# Altium PCB FMU3_REV_E.PcbDoc (part 4 of 4)
Units mm, origin at the board's own origin, x right, y up, seen from the top; angles counter-clockwise.
Board outline 34.01 x 34.03 mm, 8 copper layers (Top, GND_top, HorizontalTop, Verticall_top, Horizontal_bot, VerticalBot, GND_BOT, Bottom), stack 1.63 mm thick; 171 components, 250 nets, 878 pads, 427 vias.
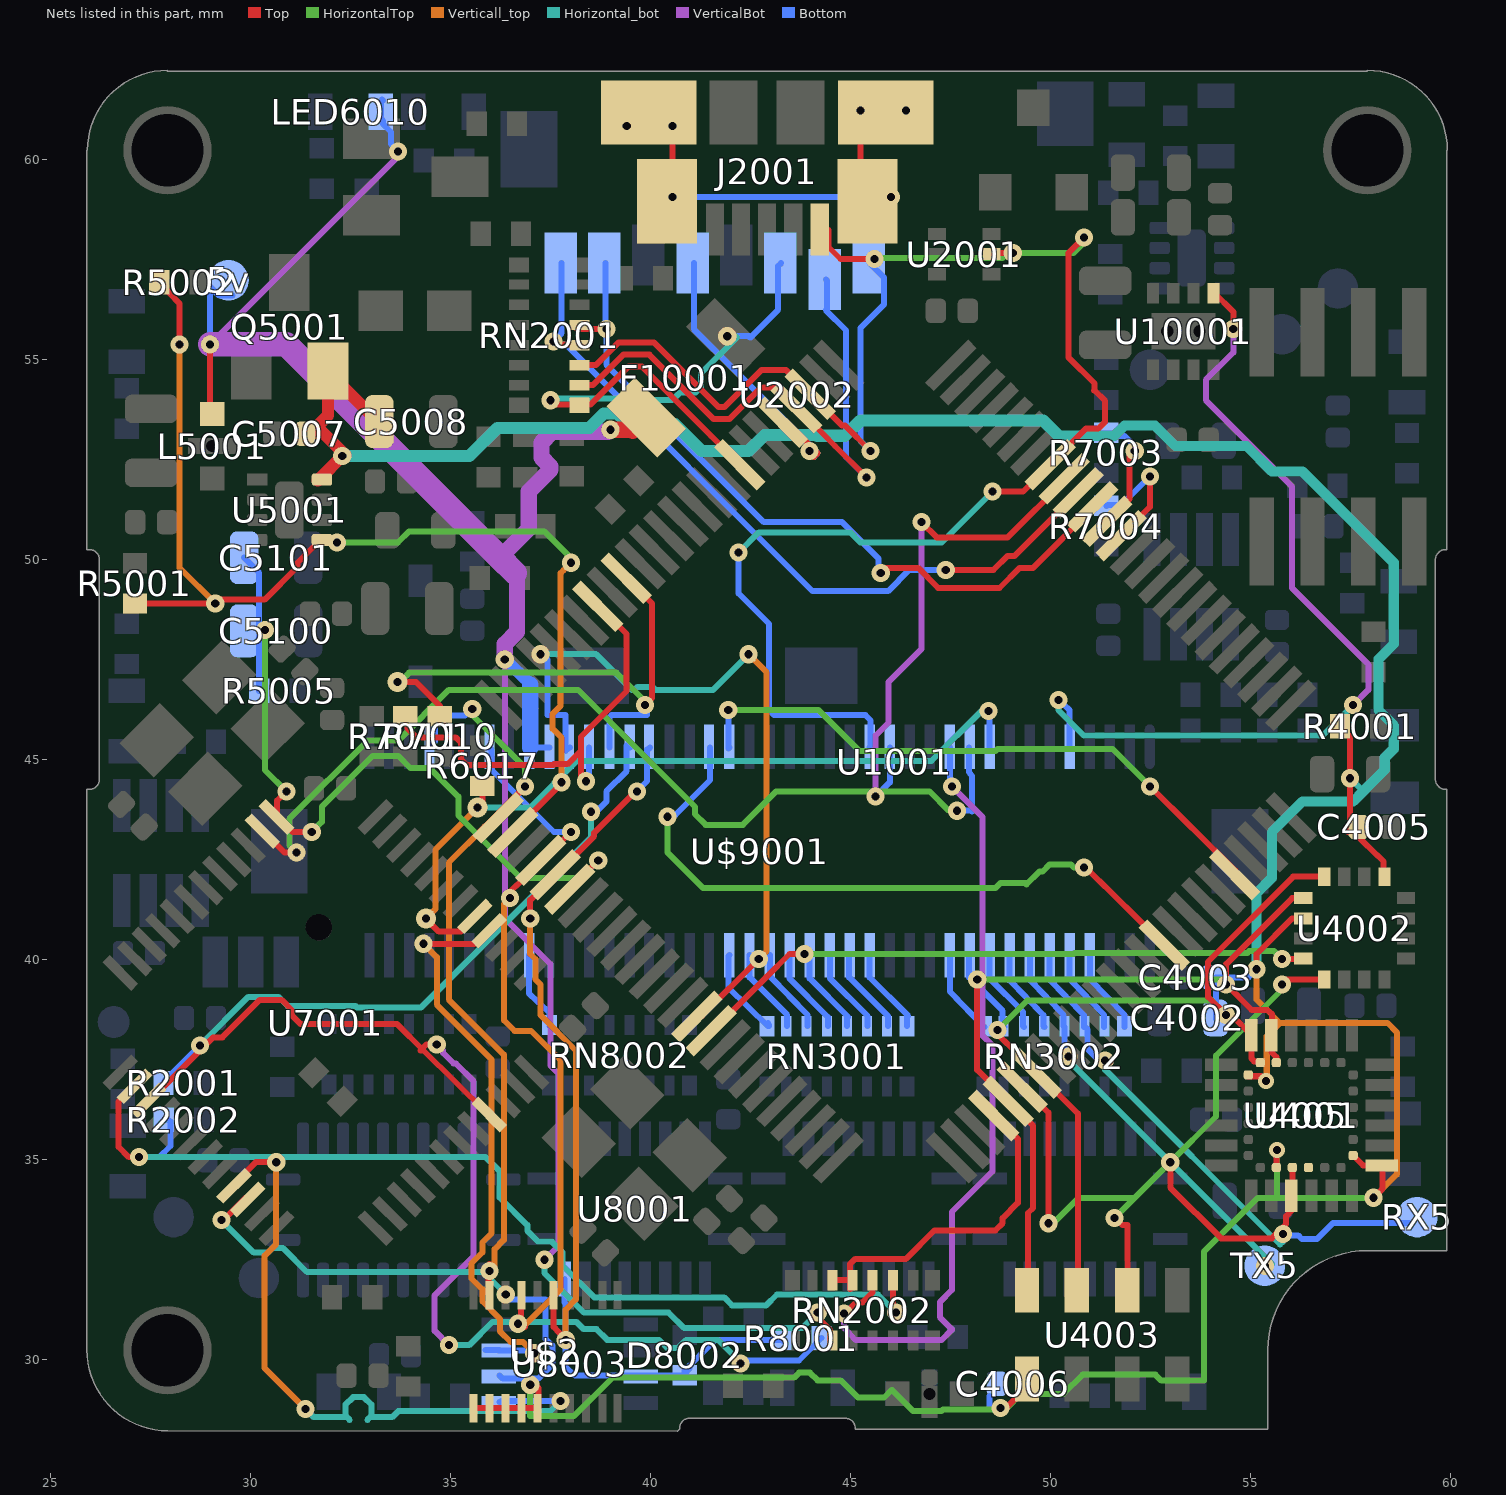
[diagram p10: the nets of this part, all layers, seen from the top]

## Via types
v1: diameter 0.453/0.453/0.453/0.453/0.453/0.453/0.453/0.453 (per signal layer), hole 0.203, Top to Bottom, tented both sides, 178 vias
v2: diameter 0.453/0.453/0.453/0.453 (per signal layer), hole 0.203, Top to Verticall_top, tented both sides, 117 vias
v3: diameter 0.453/0.453/0.453/0.453 (per signal layer), hole 0.203, Horizontal_bot to Bottom, tented both sides, 94 vias
v4: diameter 0.4, hole 0.2, Horizontal_bot to Bottom, tented both sides, 8 vias
v5: diameter 0.4, hole 0.2, Top to Verticall_top, tented both sides, 7 vias
v6: diameter 0.45, hole 0.2, Horizontal_bot to Bottom, tented bottom, 4 vias
v7: diameter 0.5, hole 0.2, Top to Verticall_top, tented both sides, 4 vias
v8: diameter 0.4, hole 0.2, Top to Bottom, tented bottom, 2 vias
v9: diameter 0.453/0.453/0.453/0.453/0.453/0.453/0.453/0.453 (per signal layer), hole 0.203, Top to Bottom, tented top, 2 vias
v10: diameter 0.5, hole 0.2, Horizontal_bot to Bottom, tented both sides, 2 vias
v11: diameter 0.453/0.453/0.453/0.453 (per signal layer), hole 0.203, Horizontal_bot to Bottom, tented bottom, 1 vias
v12: diameter 0.45, hole 0.2, Top to Verticall_top, tented top, 1 vias
v13: diameter 0/0/0/0/0/0 (per signal layer), hole 0.66, HorizontalTop to Bottom, tented bottom, 1 vias
v14: diameter 0.5, hole 0.2, Top to Bottom, tented both sides, 1 vias
v15: diameter 0.4, hole 0.2, Top to Bottom, tented both sides, 1 vias
v16: diameter 0.453/0.453/0.453/0.453/0.453/0.453/0.453/0.453 (per signal layer), hole 0.203, Top to Bottom, tented bottom, 1 vias
v17: diameter 0.453/0.453/0.453/0.453 (per signal layer), hole 0.203, Top to Verticall_top, tented top, 1 vias
v18: diameter 0.5, hole 0.2, HorizontalTop to Bottom, tented both sides, 1 vias
v19: diameter 0.4, hole 0.2, Top to Verticall_top, tented top, 1 vias

## Nets (pads, with @x,y where several pads share a name; then routed paths per layer and width w, separated by ;. In a path a pad name is that pad's centre, name@x,y a point inside that pad or via, vN(x,y) a via of type N, cw(c..) or ccw(c..) an arc to the next point about the centre after c; other vN are vias at no path point) (continued)
PRESSURE_SENS_IN: RN2002.12 U$9001.21 | length 20.2
  Top w0.15: v1(44.831,31.14) 45.136,31.42 45.288,31.42 45.542,31.674 RN2002.12@45.542,31.979
  VerticalBot w0.15: v1(44.831,31.14) 44.831,30.785 45.11,30.48 47.269,30.48 47.523,30.734 47.523,30.754 47.223,31.054 47.223,31.43 47.523,31.73 47.523,33.68 48.539,34.696 48.539,35.865 48.539,37.846 48.285,38.1 48.285,43.561 v3(47.523,44.323)
  Bottom w0.15: U$9001.21@47.473,45.288 47.473,44.399 v3(47.523,44.323)
PROT_SPARE_1: RN3002.16 U$9001.8 | length 2.2
  Bottom w0.15: U$9001.8@50.978,40.107 50.978,39.497 51.841,38.608 51.841,38.329 RN3002.16@51.841,38.303
PROT_SPARE_2: RN3002.15 U$9001.10 | length 2.2
  Bottom w0.15: U$9001.10@50.47,40.107 50.47,39.497 51.333,38.608 51.333,38.329 RN3002.15@51.333,38.303
REGOUT: U405.10
RSSI_IN: R8001.P$1 U7001.15 U7001.33 | length 30.3
  Top w0.15: U7001.15@27.457,36.449 29.058,38.049 29.286,38.049 30.22,38.983 30.769,38.983 31.033,38.719 31.033,38.588 31.242,38.379 33.655,38.379 34.315,37.719 ; v1(34.646,37.871) 34.392,37.871 34.239,37.719 34.315,37.719 ; U7001.33@35.966,36.144 35.916,36.144 34.315,37.719
  Horizontal_bot w0.15: v3(34.95,30.353) 35.458,30.353 36.039,30.934 38.137,30.934 38.319,30.751 38.639,30.751 38.905,30.485 40.199,30.485 40.403,30.28 40.674,30.28 40.878,30.485 41.677,30.485 42.266,29.896 v3(42.24,29.896)
  VerticalBot w0.15: v1(34.646,37.871) 34.804,37.713 34.804,37.659 35.068,37.394 35.123,37.394 35.57,36.947 35.57,32.572 34.593,31.596 34.593,30.71 v3(34.95,30.353)
  Bottom w0.15: v3(42.24,29.896) 42.314,29.97 43.703,29.97 R8001.P$1@44.264,30.531
S.BUS_OUT: RN8002.9 U$9001.64 | length 2
  Bottom w0.15: U$9001.64@36.957,40.107 36.957,40.081 36.957,39.141 37.465,38.659 RN8002.9@37.465,38.329
S\B\U\S\_\O\U\T\P\U\T\_\E\N\: U7001.40 U8003.7 | length 15.1
  Top w0.15: v2(34.315,40.386) 35.585,40.386 U7001.40@35.966,40.742
  Verticall_top w0.15: v2(34.315,40.386) 34.648,40.053 34.648,38.864 36.02,37.491 36.02,33.15 35.791,32.921 35.791,32.672 35.514,32.395 35.514,32.02 35.779,31.754 35.791,31.754 35.791,31.443 36.225,31.009 36.225,30.699 36.49,30.434 36.8,30.434 v1(37.084,30.15)
  Bottom w0.15: U8003.7@35.865,30.226 U8003.7@36.22,30.226 ; U8003.7@36.195,30.221 37.013,30.221 v1(37.084,30.15)
SAFETY: R6017.P$1 U7001.41 U$9001.17 | length 20.1
  Top w0.15: v7(34.374,41.013) 34.699,40.688 35.253,40.688 35.598,41.033 U7001.41@35.598,41.073 ; v14(35.662,43.79) 35.789,43.917 R6017.P$1@35.789,44.331
  Verticall_top w0.15: v7(34.374,41.013) 34.62,41.258 34.62,42.748 v14(35.662,43.79)
  Horizontal_bot w0.15: v14(35.662,43.79) 36.982,43.79 38.151,44.958 47.015,44.958 48.26,46.203 v3(48.438,46.203)
  Bottom w0.15: v3(48.438,46.203) 48.463,46.177 U$9001.17@48.463,45.288
SBUS_INPUT: U7001.22 U8003.6 | length 13.4
  Top w0.15: v1(29.261,33.477) 29.235,33.477 29.235,33.401 29.87,34.036 U7001.22@29.947,34.036
  Horizontal_bot w0.15: v1(29.261,33.477) 30.074,32.664 30.419,32.664 30.534,32.779 30.804,32.779 31.401,32.182 35.814,32.182 36.303,31.692 v3(36.373,31.623) v3@36.22,31.623
  Bottom w0.15: U8003.6@36.22,29.591 36.297,29.515 37.186,29.515 37.537,29.866 37.537,30.337 37.363,30.511 37.363,31.496 36.5,31.496 v3(36.373,31.623)
SBUS_OUTPUT: U7001.21 U8003.5 | length 17.2
  Top w0.15: U7001.21@29.591,34.366 29.591,34.392 30.124,34.925 v2(30.632,34.925)
  Verticall_top w0.15: v2(30.632,34.925) 30.632,32.878 30.342,32.587 30.342,29.78 v1(31.369,28.753)
  Horizontal_bot w0.15: v1(31.369,28.753) 31.57,28.552 32.403,28.552 ; 32.469,28.486 32.363,28.592 32.363,28.863 32.555,29.054 32.825,29.054 33.016,28.863 33.016,28.592 32.911,28.486 ; 32.976,28.552 33.53,28.552 33.68,28.702 37.49,28.702 v3(37.744,28.956)
  Bottom w0.15: U8003.5@36.22,28.931 36.246,28.931 36.271,28.956 v3(37.744,28.956)
SBUS_UNPROTECTED: D8002.C R8001.P$2 U8001.9 U8003.3 | length 8.4
  Bottom w0.15: U8001.9@37.846,32.004 37.846,31.42 37.871,31.369 37.871,29.794 38.1,29.591 40.767,29.591 D8002.C@40.843,29.642 ; D8002.C@40.843,29.616 D8002.C@40.843,29.642 ; D8002.C@40.97,29.845 40.97,29.769 D8002.C@40.843,29.642 ; R8001.P$2@43.307,30.455 43.286,30.476 41.601,30.476 40.843,29.718 D8002.C@40.843,29.642
SDIO_CK: U1001.80 U2002.5 | length 7.9
  Top w0.15: U1001.80@43.282,53.442 43.383,53.442 44.171,52.654 44.075,52.559 43.967,52.666 v1(43.967,52.705)
  Bottom w0.15: U2002.5@41.072,57.404 41.072,55.753 44.171,52.654 44.075,52.559 43.967,52.666 v1(43.967,52.705)
SDIO_CMD: RN2001.1 U1001.83 U2002.3 | length 14.7
  Top w0.15: v1(37.49,53.975) 37.617,53.873 38.379,53.873 38.495,53.873 39.435,54.813 39.776,54.813 41.504,53.086 U1001.83@42.215,52.375
  Horizontal_bot w0.15: v1(37.49,53.975) 37.536,54.021 39.313,54.021 39.359,53.975 40.533,53.975 40.732,54.174 41.118,54.174 41.254,54.31 41.254,54.645 42.148,55.54 42.113,55.575 v11(41.91,55.575)
  Bottom w0.15: v11(41.91,55.575) 42.448,55.575 42.484,55.54 43.182,56.238 43.182,57.33 U2002.3@43.256,57.404
SDIO_D0: RN2001.5 U1001.65 U2002.7 | length 19
  Top w0.15: RN2001.5@38.151,55.753 RN2001.5@38.278,55.753 ; RN2001.5@38.227,55.855 38.227,55.829 RN2001.5@38.278,55.753 ; v1(38.887,55.753) RN2001.5@38.278,55.753 ; v1(45.745,49.657) 45.872,49.784 46.68,49.784 47.183,49.28 48.715,49.28 49.219,49.784 49.555,49.784 51.054,51.283 U1001.65@51.054,51.308
  Bottom w0.15: U2002.7@38.862,57.404 38.862,55.804 v1(38.887,55.753) 38.887,54.864 42.824,50.927 44.78,50.927 45.695,50.013 45.695,49.708 v1(45.745,49.657)
SDIO_D1: RN2001.4 U1001.66 U2002.8 | length 19.6
  Top w0.15: v1(37.567,55.448) 37.49,55.372 RN2001.4@38.227,55.372 ; v1(47.371,49.733) 48.567,49.733 48.92,50.086 49.096,50.086 50.673,51.664 U1001.66@50.698,51.664
  Bottom w0.15: U2002.8@37.77,57.404 37.77,55.651 v1(37.567,55.448) 37.617,55.372 37.871,55.372 44.039,49.204 45.933,49.204 46.462,49.733 v1(47.371,49.733)
SDIO_D2: RN2001.3 U1001.78 U2002.1 | length 14.6
  Top w0.15: RN2001.3@38.215,54.851 38.624,54.851 39.186,55.413 40.083,55.413 41.686,53.811 41.844,53.811 42.77,54.737 43.373,54.737 U1001.78@43.982,54.128 ; U1001.78@43.987,54.133 44.78,53.34 44.856,53.34 v1(45.491,52.705)
  Bottom w0.15: U2002.1@45.466,57.404 45.822,57.048 45.822,56.363 45.237,55.778 45.237,52.959 v1(45.491,52.705)
SDIO_D3: RN2001.2 U1001.79 U2002.2 | length 14.8
  Top w0.15: RN2001.2@38.215,54.351 38.548,54.351 39.311,55.113 39.959,55.113 41.562,53.511 41.968,53.511 42.757,54.3 43.128,54.3 U1001.79@43.64,53.787 ; U1001.79@43.631,53.778 43.637,53.772 43.688,53.772 44.602,52.832 v1@45.364,52.07
  Bottom w0.15: U2002.2@44.374,56.998 44.397,56.975 44.397,56.252 44.374,56.229 44.879,55.724 44.879,52.556 45.364,52.07 v1@45.364,52.045
  other v1: 45.39,52.045
SERIAL1_CTS: RN3001.9 U$9001.44 | length 2.3
  Bottom w0.15: U$9001.44@41.961,40.107 41.935,40.081 41.935,39.294 42.926,38.329 42.951,38.329 42.951,38.354 RN3001.9@42.926,38.405
SERIAL1_RTS: RN3001.10 U$9001.42 | length 2.2
  Bottom w0.15: U$9001.42@42.469,40.107 42.469,39.548 43.409,38.608 RN3001.10@43.409,38.329
SERIAL1_RX: RN3001.12 U$9001.38 | length 2.2
  Bottom w0.15: U$9001.38@43.459,40.107 43.459,39.522 44.425,38.557 RN3001.12@44.425,38.329
SERIAL1_TX: RN3001.11 U$9001.40 | length 2.2
  Bottom w0.15: U$9001.40@42.977,40.107 42.977,39.573 43.917,38.608 RN3001.11@43.917,38.329
SERIAL2_CTS: RN3001.15 U$9001.32 | length 2.2
  Bottom w0.15: U$9001.32@44.958,40.107 44.958,39.548 45.923,38.583 RN3001.15@45.923,38.329
SERIAL2_RTS: RN3001.16 U$9001.30 | length 2.2
  Bottom w0.15: U$9001.30@45.466,40.107 45.466,39.548 46.431,38.583 46.406,38.583 RN3001.16@46.406,38.329
SERIAL2_RX: RN3001.14 U$9001.34 | length 2.2
  Bottom w0.15: U$9001.34@44.475,40.107 44.475,39.522 45.415,38.583 45.415,38.557 RN3001.14@45.415,38.329
SERIAL2_TX: RN3001.13 U$9001.36 | length 2.2
  Bottom w0.15: U$9001.36@43.967,40.107 43.967,39.522 44.933,38.557 44.907,38.557 RN3001.13@44.907,38.329
SERIAL3_RX: RN3002.10 U$9001.20 | length 2.2
  Bottom w0.15: U$9001.20@47.955,40.107 47.955,39.548 48.793,38.71 48.793,38.354 RN3002.10@48.844,38.303
SERIAL3_TX: RN3002.9 U$9001.22 | length 2.2
  Bottom w0.15: U$9001.22@47.473,40.107 47.473,39.192 RN3002.9@48.336,38.303
SERIAL4_RX: RN3002.12 U$9001.16 | length 2.2
  Bottom w0.15: U$9001.16@48.971,40.107 48.971,39.472 49.809,38.608 49.809,38.329 RN3002.12@49.835,38.303
SERIAL4_TX: RN3002.11 U$9001.18 | length 2.2
  Bottom w0.15: U$9001.18@48.463,40.107 48.463,39.525 49.301,38.687 49.301,38.329 RN3002.11@49.327,38.303
SERIAL5_RX: RN3002.14 RX5.P$1 U$9001.12 | length 13.4
  Horizontal_bot w0.15: v6(51.359,37.465) 51.359,37.236 55.728,32.868 55.802,32.942 v6(55.802,33.128)
  Bottom w0.15: U$9001.12@49.962,40.107 49.962,39.497 50.825,38.608 RN3002.14@50.825,38.303 ; RN3002.14@50.839,38.329 50.92,38.248 50.92,37.752 51.206,37.465 v6(51.359,37.465) ; v6(55.802,33.128) 55.833,33.096 56.181,33.096 56.277,33 56.651,33 57.048,33.397 57.048,33.401 RX5.P$1@58.953,33.401
SERIAL5_TX: RN3002.13 TX5.P$1 U$9001.14 | length 10.3
  Horizontal_bot w0.15: v6(50.444,37.567) 50.444,37.465 55.524,32.385 55.474,32.334 v6(55.347,32.334)
  Bottom w0.15: U$9001.14@49.479,40.107 49.479,39.472 50.317,38.608 50.317,38.329 50.343,38.303 v6@50.343,37.668
SERIAL_FMU_TO_IO: R7004.P$2 U1001.63 | length 3.2
  Top w0.15: U1001.63@51.765,50.597 52.476,51.308 v1(52.476,52.07)
  Bottom w0.15: R7004.P$2@51.384,51.333 51.435,51.359 51.765,51.359 v1(52.476,52.07)
SERIAL_IO_TO_FMU: R7003.P$2 U1001.64 | length 3
  Top w0.15: U1001.64@51.41,50.952 51.968,51.511 51.968,52.578 v1(52.095,52.705)
  Bottom w0.15: R7003.P$2@51.384,53.162 51.46,53.086 51.841,53.086 52.095,52.832 v1(52.095,52.705)
SPI_EXT_MISO: U1001.4 U$2.14 U$9001.67 | length 18.5
  Top w0.15: v2(36.474,41.529) 36.474,41.681 37.269,42.451 37.287,42.469 v1(37.998,43.18) ; U$2.14@36.779,31.598 36.754,31.572 36.754,30.963 v2(36.678,30.886) 36.779,30.886 v2@36.855,30.81
  Verticall_top w0.15: v2(36.474,41.529) 36.326,41.381 36.326,38.471 36.592,38.206 37.009,38.206 37.744,37.47 37.744,31.75 36.881,30.886 v2(36.678,30.886)
  Bottom w0.15: U$9001.67@35.966,45.288 36.015,45.24 36.015,44.742 37.577,43.18 v1(37.998,43.18)
SPI_EXT_MOSI: U1001.5 U$2.10 U$9001.51 | length 18.1
  Top w0.15: v2(36.982,41.021) 36.982,41.478 U1001.5@37.694,42.189 ; U$2.10@37.567,31.598 37.567,30.81 v2(37.871,30.48) v2@37.871,30.505 ; U1001.5@37.617,42.113 37.694,42.113 U1001.5@37.694,42.189 ; v1(39.649,44.196) 39.619,44.196 38.583,43.16 38.583,43.078 U1001.5@37.694,42.189
  Verticall_top w0.15: v2(36.982,41.021) 36.982,40.132 37.109,40.005 37.109,39.497 37.236,39.37 37.236,38.608 38.125,37.719 38.125,31.496 37.871,31.242 v2(37.871,30.48)
  Bottom w0.15: v1(39.649,44.196) 39.903,44.45 39.903,45.237 U$9001.51@39.98,45.288
SPI_EXT_SCK: U1001.1 U$2.18 U$9001.73 | length 19.6
  Top w0.15: U$2.18@35.966,31.598 35.966,31.623 35.941,31.623 35.941,32.029 35.966,32.029 v2@35.966,32.385 ; U1001.1@36.188,43.532 36.188,43.655 v2(36.855,44.323)
  HorizontalTop w0.15: v1(35.535,46.253) 35.535,46.105 36.855,44.784 v2(36.855,44.323)
  Verticall_top w0.15: v2(35.966,32.207) 36.093,32.334 36.093,32.754 36.324,32.985 36.324,37.615 34.95,38.989 34.95,42.418 35.846,43.313 35.859,43.313 36.855,44.31 v2(36.855,44.323)
  Bottom w0.15: U$9001.73@34.468,45.314 34.597,45.443 34.597,46.099 35.354,46.099
SPI_INT_MAG_!CS: U1001.16 U4002.4 | length 15.7
  Top w0.15: U1001.16@41.529,38.227 41.554,38.227 42.88,39.552 42.885,39.552 43.465,40.132 v2(43.84,40.132) ; v2(55.778,40.005) 56.286,40.005 56.286,40.03 U4002.4@56.312,40.03
  HorizontalTop w0.15: v2(43.84,40.132) 50.571,40.132 50.601,40.161 54.913,40.161 54.956,40.204 55.58,40.204 v2(55.778,40.005)
SPI_INT_MISO: U405.9 U1001.31 U4001.9 U4002.5 U4003.6 | length 22.5
  Top w0.15: U1001.31@49.301,36.805 49.936,36.17 v2(49.936,33.401) ; v2(51.587,33.528) 51.791,33.35 51.918,33.35 U4003.6@51.918,31.725 ; v2(52.984,34.925) 52.984,34.29 54.254,33.02 55.524,33.02 55.88,33.376 55.88,33.579 56.032,33.731 U4001.9@56.032,34.112 ; v2(55.778,39.37) 55.905,39.497 U4002.5@56.845,39.497 ; U4001.9@56.036,34.118 U405.9@56.036,34.793
  HorizontalTop w0.15: v2(49.936,33.401) 50.063,33.401 50.698,34.036 52.095,34.036 ; v2(51.587,33.528) 52.095,34.036 ; v2(55.778,39.37) 55.778,39.243 54.127,37.592 54.127,36.068 v2(52.984,34.925) 52.095,34.036
SPI_INT_MOSI: U405.24 U1001.32 U4001.24 U4002.16 U4003.7 | length 20.5
  Top w0.15: v2(48.666,38.227) 48.666,38.125 49.657,37.16 50.673,36.144 U4003.7@50.673,31.725 ; U4001.24@55.011,38.1 55.011,37.521 55.083,37.449 55.236,37.449 U405.24@55.236,37.415 ; U4001.24@55.016,38.1 54.508,38.608 v2(54.381,38.608) 53.929,39.061 53.929,39.933 56.058,42.062 U4002.16@56.845,42.062
  HorizontalTop w0.15: v2(48.666,38.227) 49.403,38.964 54.026,38.964 v2(54.381,38.608)
SPI_INT_SCK: U405.23 U1001.30 U4001.23 U4002.1 U4003.8 | length 20.5
  Top w0.15: v2(48.158,39.497) 48.158,37.236 49.555,35.839 49.555,33.782 49.428,33.655 U4003.8@49.428,31.725 ; U4001.23@55.511,38.1 55.511,37.682 55.636,37.557 U405.23@55.636,37.415 ; U4001.23@55.524,38.1 55.524,38.633 55.397,38.735 55.016,38.735 v2(54.381,39.37) 54.381,39.878 56.032,41.529 U4002.1@56.312,41.529
  HorizontalTop w0.15: v2(48.158,39.497) 54.254,39.497 v2(54.381,39.37)
USB_GND_SHIELD: J2001.GND1 J2001.GND2 J2001.GND3 J2001.GND4 | length 15.7
  Top w0.15: v1(39.395,60.833) J2001.GND4@39.395,60.96 ; J2001.GND4@39.954,61.265 40.107,61.265 v1(40.538,60.833) v1(40.538,59.055) 40.411,59.182 40.03,59.182 40.259,58.979 J2001.GND3@40.411,58.979 ; v1(45.237,61.214) 45.237,59.817 v1(45.999,59.055) 45.491,59.055 J2001.GND2@45.415,58.979
  Top w0.406: J2001.GND4@39.268,60.96 39.395,60.96 J2001.GND4@39.751,60.96 ; v1(45.237,61.214) v1(46.38,61.214) 46.38,61.265 J2001.GND1@45.872,61.265
  Bottom w0.15: v1@40.411,59.055 v1(40.538,59.055) v1(45.999,59.055)
  Bottom w0.406: v1(39.395,60.833) v1(40.538,60.833)
V\B\U\S\_\V\A\L\I\D\: U1001.15 U$9001.59 | length 19.1
  Top w0.15: U1001.15@41.173,38.583 41.275,38.583 v2(42.697,40.005)
  Verticall_top w0.15: v1(42.443,47.625) 42.896,47.172 42.896,40.204 v2(42.697,40.005)
  Horizontal_bot w0.15: v3(37.236,47.625) 38.633,47.625 39.522,46.736 39.593,46.736 39.665,46.808 40.04,46.808 40.112,46.736 41.554,46.736 v1(42.443,47.625)
  Bottom w0.15: v3(37.236,47.625) 37.363,47.498 37.414,47.498 37.414,46.101 37.871,46.101 37.871,45.212 U$9001.59@37.973,45.288
V\D\D\_\5\V\_\H\I\P\O\W\E\R\_\O\C\: U1001.41 U$9001.45 | length 17
  Top w0.15: v2(50.825,42.291) 50.876,42.291 U1001.41@52.832,40.361
  HorizontalTop w0.15: v1(40.411,43.561) 40.411,42.672 41.298,41.785 48.617,41.785 48.735,41.903 49.36,41.903 49.391,41.873 49.71,42.192 49.791,42.192 49.962,42.363 50.505,42.363 50.577,42.291 v2(50.825,42.291)
  Bottom w0.15: v1(40.411,43.561) 40.462,43.612 40.615,43.612 41.478,44.475 U$9001.45@41.478,45.288
V\D\D\_\5\V\_\P\E\R\I\P\H\_\E\N\: U1001.67 U$9001.27 | length 13.1
  Top w0.15: v1(46.761,50.927) 47.142,50.546 48.92,50.546 50.368,51.994 U1001.67@50.368,52.019
  VerticalBot w0.15: v3(45.618,44.069) 45.618,45.593 45.944,45.919 45.944,46.935 46.761,47.752 v1(46.761,50.927)
  Bottom w0.15: v3(45.618,44.069) 45.974,44.425 U$9001.27@45.974,45.288
V\D\D\_\5\V\_\P\E\R\I\P\H\_\O\C\: U1001.46 U$9001.43 | length 15.5
  Top w0.15: v2(52.476,44.323) 54.61,42.215 U1001.46@54.61,42.113
  HorizontalTop w0.15: v1(41.935,46.228) 44.196,46.228 45.212,45.212 48.618,45.212 48.661,45.256 51.544,45.256 v2(52.476,44.323)
  Bottom w0.15: U$9001.43@41.935,45.263 U$9001.43@41.935,45.288 ; v1(41.935,46.228) U$9001.43@41.935,45.288 ; U$9001.43@41.961,45.288 U$9001.43@41.935,45.288
V\D\D\_\B\A\C\K\U\P\_\V\A\L\I\D\: R7011.P$2 U1001.93 U$9001.57 | length 11.9
  Top w0.15: R7011.P$2@33.909,46.076 33.909,45.771 34.132,45.548 35.12,45.548 35.255,45.413 35.255,44.994 35.39,44.859 37.564,44.859 37.582,44.877 37.918,44.877 38.252,45.212 38.252,45.562 ; v1(38.379,44.45) 38.252,44.577 38.252,45.562 ; U1001.93@38.684,48.844 38.71,48.844 39.395,48.133 39.395,46.705 38.252,45.562
  Bottom w0.15: v1(38.379,44.45) 38.456,44.526 U$9001.57@38.456,45.288
V\D\D\_\B\R\I\C\K\_\V\A\L\I\D\: R7010.P$2 U1001.91 U$9001.55 | length 13.9
  Top w0.15: v7(33.663,46.935) 34.122,46.935 34.722,46.335 R7010.P$2@34.722,46.076 ; U1001.91@39.395,49.53 39.421,49.53 40.03,48.895 40.03,46.533 v1(39.853,46.355)
  HorizontalTop w0.15: v7(33.663,46.935) 33.727,46.935 33.955,47.163 39.137,47.163 39.853,46.448 v1(39.853,46.355)
  Bottom w0.15: U$9001.55@38.964,45.288 38.964,46.05 39.014,46.101 39.903,46.101 39.903,46.406 v1(39.853,46.355)
VBAT: C5100.2 C5101.2 R5005.P$1 U1001.6 U7001.1 | length 20.2
  Top w0.15: v1(30.886,44.196) 30.658,43.967 30.658,43.561 31.039,43.18 v2(31.521,43.18) ; U1001.6@37.973,41.758 v2@38.633,42.418
  HorizontalTop w0.15: v1(30.353,48.235) 30.353,44.729 v1(30.886,44.196) ; v2(31.521,43.18) 31.775,43.434 31.775,43.815 33.045,45.085 33.68,45.085 33.99,44.776 34.472,44.776 35.185,44.063 35.185,43.592 36.741,42.037 38.252,42.037 v2@38.633,42.418
  Bottom w0.15: C5101.2@29.832,50.038 30.209,49.662 R5005.P$1@30.209,46.711
  other v2: 38.684,42.469
VBUS: J2001.VBUS U1001.68 U2001.5 U$9001.29 | length 31.8
  Top w0.15: J2001.VBUS@44.221,58.445 44.44,58.227 44.44,57.806 44.74,57.506 v2(45.593,57.506) ; U2001.5@48.514,57.633 48.463,57.633 48.438,57.658 v2(49.047,57.658) ; v1(48.539,51.689) 49.301,51.689 49.987,52.375 50.013,52.375 50.013,52.4 50.876,53.264 51.181,53.264 51.354,53.437 51.354,53.959 51.089,54.225 ; v2(50.825,58.039) 50.673,57.887 50.444,57.658 50.444,55.042 51.089,54.397 51.089,54.225 ; 51.084,54.225 51.089,54.225
  HorizontalTop w0.15: v2(45.593,57.506) 45.568,57.531 48.793,57.531 48.92,57.658 v2(49.047,57.658) 50.571,57.658 50.825,57.912 v2(50.825,58.039)
  Horizontal_bot w0.15: v3(42.189,50.165) 42.697,50.673 44.983,50.673 45.237,50.419 47.269,50.419 v1(48.539,51.689)
  Bottom w0.15: v3(42.189,50.165) 42.189,49.149 42.951,48.387 42.951,46.228 43.078,46.101 45.364,46.101 45.491,45.974 45.491,45.339 U$9001.29@45.466,45.288
VDD_3V3_SENSORS: C4002.P$1 C4003.P$1 C4005.P$1 C4006.P$1 C5007.P$1 C5008.P$1 Q5001.E R4001.P$2 U405.1 U405.8 U405.13 U4001.13 U4002.2 U4002.13 U4003.1 U5001.8 U$2.11 U$2.13 U$2.15 U$2.17 U$2.19 | length 102.9
  Top w0.15: C5007.P$1@31.471,53.137 C5007.P$1@31.471,53.162 ; U5001.8@31.725,52.019 31.75,52.019 U5001.8@31.775,51.994 ; Q5001.E@31.928,54.712 31.928,54.737 Q5001.E@31.979,54.788 ; v1(32.283,52.578) 32.334,52.578 v1@32.36,52.603 ; C5008.P$1@33.071,53.442 C5008.P$1@33.071,53.543 ; U$2.19@35.585,28.778 37.186,28.778 37.186,29.286 37.109,29.362 v2(36.982,29.362) 37.008,29.362 v2@37.059,29.413 ; v1(48.743,28.778) 48.87,28.778 49.454,29.362 49.454,29.718 49.428,29.718 U4003.1@49.428,29.515 ; U4003.1@49.428,29.464 U4003.1@49.428,29.515 ; U4003.1@49.428,29.591 U4003.1@49.428,29.515 ; v1(55.143,39.751) 55.143,40.132 56.032,41.021 U4002.2@56.312,41.021 ; R4001.P$2@57.226,45.822 57.48,45.568 v1(57.48,44.526) C4005.P$1@57.48,43.256 ; 57.429,43.307 57.455,43.307 C4005.P$1@57.48,43.256 ; v1(58.064,34.036) 58.293,34.265 58.293,34.823 U4001.13@58.268,34.849 ; U4002.13@58.344,42.062 58.318,42.088 58.318,42.443 57.556,43.18 57.429,43.18 C4005.P$1@57.48,43.256
  Top w0.152: U405.1@54.936,37.109 54.936,37.075 55.254,37.075 v5(55.378,36.951) ; U405.8@55.636,34.793 55.636,35.214 v5(55.651,35.23) ; U405.13@57.558,35.093 57.808,34.843 U4001.13@58.268,34.843
  Top w0.305: C5007.P$1@31.369,53.162 31.471,53.162 31.801,53.162 v1@32.36,52.603 ; C5007.P$1@31.471,53.137 31.928,53.594 Q5001.E@31.928,54.712 ; U5001.8@31.674,51.968 31.725,52.019 v1(32.283,52.578) ; Q5001.E@31.979,54.788 31.979,54.635 C5008.P$1@33.071,53.543
  HorizontalTop w0.15: v2(36.982,29.362) 36.982,28.575 38.075,28.575 39.04,29.54 43.58,29.54 43.705,29.665 43.976,29.665 44.168,29.473 44.746,29.473 45.181,29.037 45.827,29.037 46.025,29.235 46.556,28.704 47.261,28.704 47.297,28.74 48.704,28.74 v1(48.743,28.778) 48.895,28.778 49.251,29.134 50.311,29.134 50.794,29.616 52.61,29.616 52.762,29.464 53.823,29.464 53.823,32.69 55.169,34.036 v1(58.064,34.036)
  HorizontalTop w0.152: 55.651,34.087 v5(55.651,35.23)
  Verticall_top w0.15: v1(55.143,39.751) 55.143,38.989 55.728,38.405 58.42,38.405 58.651,38.174 58.651,34.623 v1(58.064,34.036)
  Verticall_top w0.152: v5(55.378,36.951) 55.397,36.97 55.397,38.075 55.728,38.405
  Horizontal_bot w0.15: v1(57.48,44.526) 57.81,44.196
  Horizontal_bot w0.254: 50.19,53.086 51.587,53.086 51.841,53.34 52.603,53.34 53.111,52.832 54.889,52.832 55.524,52.197 56.286,52.197 58.572,49.911 58.572,47.879 58.191,47.498 58.191,46.228 58.572,45.847 58.572,45.264 58.348,45.04 58.348,44.734 57.81,44.196 57.556,43.942 56.286,43.942 55.524,43.18 55.524,42.037 55.143,41.656 v1(55.143,39.751)
  Horizontal_bot w0.305: v1(32.283,52.578) 35.458,52.578 36.163,53.282 38.462,53.282 38.822,53.642 39.156,53.642 39.424,53.375 40.603,53.375 41.273,52.705 42.443,52.705 42.847,53.109 44.135,53.109 44.158,53.086 44.856,53.086 45.237,53.467 49.809,53.467 50.19,53.086
  Bottom w0.15: 48.463,29.083 48.463,28.804 48.489,28.778 v1(48.743,28.778) ; C4002.P$1@54.178,38.532 54.127,38.506 54.127,39.548 54.94,39.548 v1(55.143,39.751)
VDD_3V3_SENSORS_EN: R5001.P$2 R5002.P$2 U1001.2 U5001.5 | length 28.6
  Top w0.15: R5001.P$2@27.102,48.92 27.127,48.895 v2(29.108,48.895) 29.203,48.99 30.346,48.99 31.166,49.809 31.166,49.911 31.674,50.419 v2(32.156,50.419) 31.826,50.419 U5001.5@31.775,50.495 ; R5002.P$2@27.737,56.921 27.737,56.896 28.219,56.388 v2(28.219,55.372) ; U1001.2@36.547,43.173 37.77,44.396 v2(37.77,44.425)
  HorizontalTop w0.15: v2(32.156,50.419) 33.675,50.419 33.954,50.698 37.338,50.698 37.998,50.038 v2(37.998,49.911)
  Verticall_top w0.15: v2(28.219,55.372) 28.219,49.781 28.222,49.781 v2(29.108,48.895) ; v2(37.77,44.425) 37.77,45.537 37.546,45.761 37.546,46.136 37.744,46.335 37.744,49.652 37.816,49.723 37.816,49.729 v2(37.998,49.911)
VDD_3V3_SPEKTRUM_EN: U7001.2 U$9001.19 | length 24.1
  Top w0.15: U7001.2@30.302,43.205 30.836,42.672 v2(31.14,42.672)
  HorizontalTop w0.15: v2(31.14,42.672) 30.963,42.85 30.963,43.51 32.918,45.466 33.68,45.466 34.95,46.736 38.177,46.736 41.102,43.812 41.102,43.627 41.367,43.362 42.297,43.362 43.13,44.196 46.965,44.196 47.447,43.713 v1(47.65,43.713)
  Bottom w0.15: v1(47.65,43.713) 48.006,43.713 48.031,43.688 48.031,44.577 47.955,44.679 U$9001.19@47.955,45.288
VDD_5V_IN: 5v.P$1 F10001.1 L5001.P$1 LED6010.A RN2002.3 U$9001.61 U$9001.63 | length 58.4
  Top w0.15: v1(28.981,55.372) 28.981,53.696 L5001.P$1@29.032,53.645 ; v1(44.171,31.166) 44.171,31.039 44.475,30.734 RN2002.3@44.475,30.378
  Top w0.406: v1(38.989,53.238) F10001.1@39.573,53.238 ; F10001.1@39.548,53.213 F10001.1@39.573,53.238 ; F10001.1@39.879,53.544 F10001.1@39.573,53.238
  Horizontal_bot w0.15: v3(37.338,32.487) 37.338,32.156 38.329,31.166 40.441,31.166 40.822,30.785 43.79,30.785 v1(44.171,31.166)
  VerticalBot w0.15: v1(28.981,55.372) 33.68,60.071 v3(33.68,60.198) ; v3(36.347,47.498) 36.347,41.021 37.49,39.878 37.49,37.338 37.691,37.137 37.691,32.84 v3(37.338,32.487)
  VerticalBot w0.406: 36.22,50.038 36.946,50.764 36.946,51.695 37.49,52.239 37.49,52.316 37.264,52.542 37.264,52.919 37.531,53.185 38.936,53.185 v1(38.989,53.238) ; v3(36.347,47.498) 36.347,47.879 36.652,48.184 36.652,49.606 36.601,49.657
  VerticalBot w0.61: v1(28.981,55.372) 30.886,55.372 36.22,50.038 36.601,49.657
  Bottom w0.15: v1(28.981,55.372) 28.981,56.82 29.21,56.591 5v.P$1@29.54,56.591 ; LED6010.A@33.274,61.493 33.299,61.468 33.249,61.417 LED6010.A@33.249,61.189 33.249,61.036 33.299,60.96 33.299,60.884 33.503,60.681 33.503,60.376 v3(33.68,60.198) ; U$9001.63@36.957,45.288 U$9001.61@37.465,45.288 ; 36.982,46.863 36.982,46.888
  Bottom w0.254: U$9001.63@36.957,45.288 U$9001.63@36.982,45.288
  Bottom w0.305: v3(36.347,47.498) 36.982,46.888
  Bottom w0.406: U$9001.63@36.982,45.288 36.982,46.863
VDD_5V_SENS: RN2002.13 RN2002.14 U1001.29 | length 8.8
  Top w0.15: RN2002.14@44.552,31.979 45.06,31.979 45.06,31.801 44.983,31.75 44.983,32.385 45.11,32.512 46.38,32.512 47.092,33.223 48.616,33.223 48.793,33.401 48.793,33.528 49.174,33.909 49.174,35.509 U1001.29@48.59,36.119
VDD_SERVO: R2001.P$2 U$9001.53 | length 16.3
  Horizontal_bot w0.15: v3(28.727,37.846) 28.727,37.851 29.937,39.061 30.691,39.061 30.92,38.832 32.611,38.832 32.652,38.79 34.249,38.79 38.506,43.048 v3(38.506,43.688)
  Bottom w0.15: R2001.P$2@27.838,36.906 27.838,36.957 v3(28.727,37.846) ; v3(38.506,43.688) 38.633,43.688 38.887,43.942 38.887,44.196 39.395,44.704 39.395,45.339 U$9001.53@39.472,45.288
VDD_SERVO_IN: U10001.1 U$9001.9 | length 22.2
  Top w0.15: U10001.1@54.077,56.667 54.559,56.185 v1(54.559,55.753)
  Horizontal_bot w0.15: v3(50.19,46.482) 50.19,46.228 50.825,45.593 56.794,45.593 v3(57.556,46.355)
  VerticalBot w0.15: v1(54.559,55.753) 54.559,55.169 53.873,54.483 53.873,53.975 56.032,51.816 56.032,49.276 57.937,47.371 57.937,46.736 v3(57.556,46.355)
  Bottom w0.15: v3(50.19,46.482) 50.47,46.228 U$9001.9@50.47,45.288
VDD_SERVO_SENS: R2002.P$1 RN2002.11 U7001.14 | length 26.3
  Top w0.15: U7001.14@27.127,36.855 26.695,36.449 26.695,35.306 26.949,35.052 v1(27.203,35.052) ; RN2002.11@46.05,31.979 46.05,31.293 46.101,31.217 46.126,31.191 v1(46.126,31.166)
  Horizontal_bot w0.15: v1(27.203,35.052) 35.865,35.052 36.22,34.696 36.22,34.043 36.912,33.352 36.912,33.214 37.186,32.939 37.526,32.939 37.791,32.674 37.791,32.344 38.588,31.547 41.829,31.547 42.029,31.347 42.883,31.347 43.154,31.617 45.675,31.617 v1(46.126,31.166)
  Bottom w0.15: v1(27.203,35.052) 27.711,35.052 27.991,35.331 27.991,35.941 27.915,35.992 R2002.P$1@27.838,35.992
pads on no net: J2001.GND5 J2001.GND6 J2001.ID M3_MOUNT1001.1 M3_MOUNT1003.1 M3_MOUNT1004.1 RN2001.6 RN2001.7 RN2001.8 RN2001.9 RN2001.10 RN2001.11 U405.2 U405.3 U405.4 U405.5 U405.6 U405.7 U405.14 U405.15 U405.16 U405.17 U405.19 U405.21 U3001.1 U3001.3 U4001.2 U4001.3 U4001.4 U4001.5 U4001.6 U4001.7 U4001.11 U4001.14 U4001.15 U4001.16 U4001.17 U4001.19 U4001.21 U4001.22 U4002.3 U4002.7 U4002.14 U4002.15 U4003.4 U10001.3 U10002.8 U$9001.hole-2
copper on no net:
  other v13: 53.723,40.797

## Polygon pours and split planes (outlines as drawn)
VDD_3V3_SENSORS on Horizontal_bot "Horizontal_bot-VDD_3V3_SENSORS" (solid, remove dead copper, pour order 22): 38.729,57.226 60.553,57.226 60.808,27.102 48.97,27.102 49.1,33.983 53.797,34.11 53.797,39.907 56.226,42.592 58.369,45.365 58.369,48.736 54.858,52.248 50.286,52.248 49.397,53.137 45.841,53.137 45.364,53.613 43.491,51.74 37.014,51.74 36.76,51.486 31.998,51.486 31.191,52.292 31.191,52.991 31.744,53.543 35.046,53.543
FMU-VDD_3V3 on Horizontal_bot "Horizontal_bot-FMU-VDD_3V3" (solid, remove dead copper, pour order 24): 23.063,64.465 62.586,64.465 62.586,26.086 23.063,26.086
IO-VDD_3V3 on HorizontalTop "HorizontalTop-IO-VDD_3V3" (solid, remove dead copper, pour order 4): 32.442,31.42 39.218,38.195 39.218,38.386 32.188,45.415 31.363,45.415 24.968,39.021 24.968,38.703 32.252,31.42
VDD_3V3_SENSORS on HorizontalTop "HorizontalTop-VDD_3V3_SENSORS" (solid, remove dead copper, pour order 2): 58.239,48.844 60.172,48.844 60.3,27.483 48.843,27.483 48.972,33.814 49.27,34.112 53.588,34.112 53.797,34.322 53.797,40.161 58.368,45.24
FMU-VDD_3V3 on HorizontalTop "HorizontalTop-FMU-VDD_3V3" (solid, remove dead copper, pour order 6): 23.063,64.465 62.586,64.465 62.586,26.086 23.063,26.086
GND on GND_top "GND_top-GND" (solid, remove dead copper, pour order 20): 23.571,63.957 63.094,63.957 63.094,25.578 23.571,25.578
GND on GND_BOT "GND_BOT-GND" (solid, remove dead copper, pour order 18): 23.317,64.211 62.84,64.211 62.84,25.832 23.317,25.832
GND on VerticalBot "VerticalBot-GND" (solid, remove dead copper, pour order 16): 24.46,64.465 62.713,64.465 62.713,24.943 24.46,24.943
GND on Bottom "Bottom-GND" (solid, remove dead copper, pour order 14): 64.059,64.541 64.059,24.867 23.114,24.867 23.114,64.541
VDD_3V3_SENSORS on Top "Top-VDD_3V3_SENSORS" (solid, remove dead copper, pour order 10): 30.683,55.702 34.773,55.702 34.773,51.486 30.683,51.486
GND on Top "Top-GND" (solid, remove dead copper, pour order 12): 25.959,62.459 60.148,62.459 60.148,28.27 25.959,28.27
GND on Verticall_top "Verticall_top-GND" (solid, remove dead copper, pour order 8): 25.095,63.322 61.443,63.322 61.443,25.876 61.144,25.578 24.632,25.578 24.079,26.13 24.079,61.627 25.095,62.643

## Keep-outs
Keep-Out Layer:
  the board outline again, w0.1

## Other copper
Top:
  pour cut-out: 54.709,37.77 57.833,37.77 57.833,34.546 57.836,34.544 57.81,34.519 54.661,34.519 54.661,37.722
  pour cut-out: 56.54,41.834 56.515,41.808 56.515,39.7 58.649,39.7 58.649,41.834
  pour cut-out: 49.149,31.725 53.442,31.725 53.612,31.554 53.612,29.593 48.956,29.593 48.948,29.601
  pour cut-out: 28.88,40.589 30.988,40.589 30.988,39.345 31.039,39.294 28.88,39.294
  text "R-E" at 55.22,29.337 h1.52 r90
GND_top:
  pour cut-out: 54.709,37.77 57.833,37.77 57.833,34.546 57.836,34.544 57.81,34.519 54.661,34.519 54.661,37.722
  pour cut-out: 56.54,41.834 56.515,41.808 56.515,39.7 58.649,39.7 58.649,41.834
  pour cut-out: 49.073,31.725 49.174,31.623 53.619,31.623 53.619,29.566 53.518,29.464 48.92,29.464 48.92,31.572
  pour cut-out: 28.88,40.589 30.988,40.589 30.988,39.345 31.039,39.294 28.88,39.294
HorizontalTop:
  pour cut-out: 54.709,37.77 57.833,37.77 57.833,34.546 57.836,34.544 57.81,34.519 54.661,34.519 54.661,37.722
  pour cut-out: 56.54,41.834 56.515,41.808 56.515,39.7 58.649,39.7 58.649,41.834
  pour cut-out: 48.928,31.686 48.991,31.623 53.619,31.623 53.619,29.614 53.444,29.439 48.883,29.439
  pour cut-out: 28.88,40.589 30.988,40.589 30.988,39.345 31.039,39.294 28.88,39.294
Verticall_top:
  pour cut-out: 54.709,37.77 57.833,37.77 57.833,34.546 57.836,34.544 57.81,34.519 54.661,34.519 54.661,37.722
  pour cut-out: 56.54,41.834 56.515,41.808 56.515,39.7 58.649,39.7 58.649,41.834
  pour cut-out: 48.997,31.725 48.997,29.515 48.92,29.439 53.467,29.439 53.467,29.489 53.619,29.642 53.619,31.623
  pour cut-out: 28.88,40.589 30.988,40.589 30.988,39.345 31.039,39.294 28.88,39.294
Horizontal_bot:
  pour cut-out: 54.709,37.77 57.833,37.77 57.833,34.546 57.836,34.544 57.81,34.519 54.661,34.519 54.661,37.722
  pour cut-out: 56.54,41.834 56.515,41.808 56.515,39.7 58.649,39.7 58.649,41.834
  pour cut-out: 49.022,29.54 48.946,29.464 48.982,29.428 53.528,29.428 53.528,31.555 53.596,31.623 53.494,31.725 49.022,31.725
  pour cut-out: 28.88,40.589 30.988,40.589 30.988,39.345 31.039,39.294 28.88,39.294
VerticalBot:
  pour cut-out: 54.709,37.77 57.833,37.77 57.833,34.546 57.836,34.544 57.81,34.519 54.661,34.519 54.661,37.722
  pour cut-out: 56.54,41.834 56.515,41.808 56.515,39.7 58.649,39.7 58.649,41.834
  pour cut-out: 49.047,31.725 53.467,31.725 53.596,31.596 53.596,29.591 53.528,29.523 53.528,29.428 48.956,29.428 48.92,29.464
  pour cut-out: 28.88,40.589 30.988,40.589 30.988,39.345 31.039,39.294 28.88,39.294
GND_BOT:
  pour cut-out: 54.709,37.77 57.833,37.77 57.833,34.546 57.836,34.544 57.81,34.519 54.661,34.519 54.661,37.722
  pour cut-out: 56.54,41.834 56.515,41.808 56.515,39.7 58.649,39.7 58.649,41.834
  pour cut-out: 49.073,31.725 49.098,31.75 53.492,31.75 53.492,31.725 53.619,31.598 53.619,29.515 53.543,29.439 53.518,29.464 48.975,29.464
  pour cut-out: 28.88,40.589 30.988,40.589 30.988,39.345 31.039,39.294 28.88,39.294
Bottom:
  pour cut-out: 54.709,37.77 57.833,37.77 57.833,34.546 57.836,34.544 57.81,34.519 54.661,34.519 54.661,37.722
  pour cut-out: 56.54,41.834 56.515,41.808 56.515,39.7 58.649,39.7 58.649,41.834
  pour cut-out: 49.098,31.725 53.467,31.725 53.645,31.547 53.645,29.566 53.467,29.388 49.047,29.388
  pour cut-out: 28.88,40.589 30.988,40.589 30.988,39.345 31.039,39.294 28.88,39.294
  text "3DR" at 32.512,57.658 h1.52
  text "R-E" at 55.211,31.471 h1.52 r90

## Silkscreen, mask and mechanical layers (free items; w line width, h text height)
Top Overlay:
  lines w0.8: 25.9,30.238 25.9,44.247 ; 32.918,28.25 55.423,28.25 55.423,30.226 cw(c57.912,30.226) 57.912,32.715 59.9,32.715 59.9,44.247 ; 33.985,62.2 57.912,62.2
Bottom Overlay:
  text "(c)2014 MJS/LM/JO/PR/3DRobotics" at 52.984,38.659 h1.26
Dimension:
  the board outline again, w0.01
tDocu:
  drawing of 332 lines, arcs and shapes, not listed
  text "Changes for revision: C  / Removed the battery / Added capacitor C5100 and 5101" at 26.848,89.535 h1.52
  text "Layer" at 64.44,87.427 h1.52
  text "Name" at 71.072,87.427 h1.52
  text "Material" at 83.657,87.427 h1.52
  text "Thickness" at 103.369,87.427 h1.52
  text "Constant" at 112.726,87.427 h1.52
  text "Board Layer Stack" at 121.407,87.427 h1.52
  text "1" at 64.44,84.379 h1.52
  text "Top Overlay" at 71.072,84.379 h1.52
  text "2" at 64.44,81.331 h1.52
  text "Top Solder" at 71.072,81.331 h1.52
  text "Solder Resist (Black Matte)" at 83.657,81.331 h1.52
  text "0.010mm" at 103.369,81.331 h1.52
  text "3.5" at 112.726,81.331 h1.52
  text "3" at 64.44,78.283 h1.52
  text "Top" at 71.072,78.283 h1.52
  text "Copper" at 83.657,78.283 h1.52
  text "0.035mm" at 103.369,78.283 h1.52
  text "4" at 64.44,75.235 h1.52
  text "Dielectric 1" at 71.072,75.235 h1.52
  text "FR-4" at 83.657,75.235 h1.52
  text "0.150mm" at 103.369,75.235 h1.52
  text "4.8" at 112.726,75.235 h1.52
  text "Changes for revision: D / Added bypass resistor R7013 DNP for / future use (will allow for testing / without the IO chip) / Adjusted outide dimesions to remove / stress from MPU6000 and MS5611" at 26.721,73.635 h1.52
  text "5" at 64.44,72.187 h1.52
  text "GND_top" at 71.072,72.187 h1.52
  text "Copper" at 83.657,72.187 h1.52
  text "0.035mm" at 103.369,72.187 h1.52
  text "6" at 64.44,69.139 h1.52
  text "Dielectric 2" at 71.072,69.139 h1.52
  text "FR-4" at 83.657,69.139 h1.52
  text "0.250mm" at 103.369,69.139 h1.52
  text "4.8" at 112.726,69.139 h1.52
  text "7" at 64.44,66.091 h1.52
  text "HorizontalTop" at 71.072,66.091 h1.52
  text "Copper" at 83.657,66.091 h1.52
  text "0.035mm" at 103.369,66.091 h1.52
  text "8" at 64.44,63.043 h1.52
  text "Dielectric 3" at 71.072,63.043 h1.52
  text "FR-4" at 83.657,63.043 h1.52
  text "0.150mm" at 103.369,63.043 h1.52
  text "4.8" at 112.726,63.043 h1.52
  text "9" at 64.44,59.995 h1.52
  text "Verticall_top" at 71.072,59.995 h1.52
  text "Copper" at 83.657,59.995 h1.52
  text "0.035mm" at 103.369,59.995 h1.52
  text "10" at 64.44,56.947 h1.52
  text "Dielectric 4" at 71.072,56.947 h1.52
  text "FR-4" at 83.657,56.947 h1.52
  text "0.250mm" at 103.369,56.947 h1.52
  text "4.8" at 112.726,56.947 h1.52
  text "11" at 64.44,53.899 h1.52
  text "Horizontal_bot" at 71.072,53.899 h1.52
  text "Copper" at 83.657,53.899 h1.52
  text "0.035mm" at 103.369,53.899 h1.52
  text "12" at 64.44,50.851 h1.52
  text "Dielectric 5" at 71.072,50.851 h1.52
  text "FR-4" at 83.657,50.851 h1.52
  text "0.150mm" at 103.369,50.851 h1.52
  text "4.8" at 112.726,50.851 h1.52
  text "13" at 64.44,47.803 h1.52
  text "VerticalBot" at 71.072,47.803 h1.52
  text "Copper" at 83.657,47.803 h1.52
  text "0.035mm" at 103.369,47.803 h1.52
  text "14" at 64.44,44.755 h1.52
  text "Dielectric 6" at 71.072,44.755 h1.52
  text "FR-4" at 83.657,44.755 h1.52
  text "0.250mm" at 103.369,44.755 h1.52
  text "4.8" at 112.726,44.755 h1.52
  text "15" at 64.44,41.707 h1.52
  text "GND_BOT" at 71.072,41.707 h1.52
  text "Copper" at 83.657,41.707 h1.52
  text "0.035mm" at 103.369,41.707 h1.52
  text "16" at 64.44,38.659 h1.52
  text "Dielectric 7" at 71.072,38.659 h1.52
  text "FR-4" at 83.657,38.659 h1.52
  text "0.150mm" at 103.369,38.659 h1.52
  text "4.8" at 112.726,38.659 h1.52
  text "17" at 64.44,35.611 h1.52
  text "Bottom" at 71.072,35.611 h1.52
  text "Copper" at 83.657,35.611 h1.52
  text "0.035mm" at 103.369,35.611 h1.52
  text "18" at 64.44,32.563 h1.52
  text "Bottom Solder" at 71.072,32.563 h1.52
  text "Solder Resist (Black Matte)" at 83.657,32.563 h1.52
  text "0.010mm" at 103.369,32.563 h1.52
  text "3.5" at 112.726,32.563 h1.52
  text "19" at 64.44,29.515 h1.52
  text "Bottom Overlay" at 71.072,29.515 h1.52
  text "BLACK MATTE SOLDER MASK" at 79.121,26.06 h1.52
Unrouted:
  lines w0: 54.254,58.928 54.331,58.293

## Text inside footprints (layer, text, board x,y; h text height)
U405: Top Overlay "X" at 56.561,35.568 h0.26; Top Overlay "Z" at 55.386,35.168 h0.26; Top Overlay "Y" at 55.486,36.718 h0.26
U2002: bDocu "card OUT" at 44.81,66.294 h1.26; bDocu "card IN" at 44.21,62.509 h1.26
U4001: Top Overlay "Z" at 55.161,34.993 h0.26 r180; Top Overlay "Y" at 55.261,36.703 h0.26 r180; Top Overlay "X" at 56.667,35.193 h0.26 r180
U4002: Top Overlay "Z" at 57.132,40.97 h0.26; Top Overlay "Y" at 58.242,40.97 h0.26; Top Overlay "X" at 57.132,40.017 h0.26
U$9001: Bottom Overlay "Female" at 42.723,41.427 h1.97